# Altium PCB PCB1.pcbdoc (part 2 of 2)
Units mil, origin at the board's own origin, x right, y up, seen from the top; angles counter-clockwise.
Board outline 3937.01 x 2559.06 mil, 2 copper layers (Top Layer, Bottom Layer), stack 62.206 mil thick; 130 components, 96 nets, 456 pads, 345 vias.
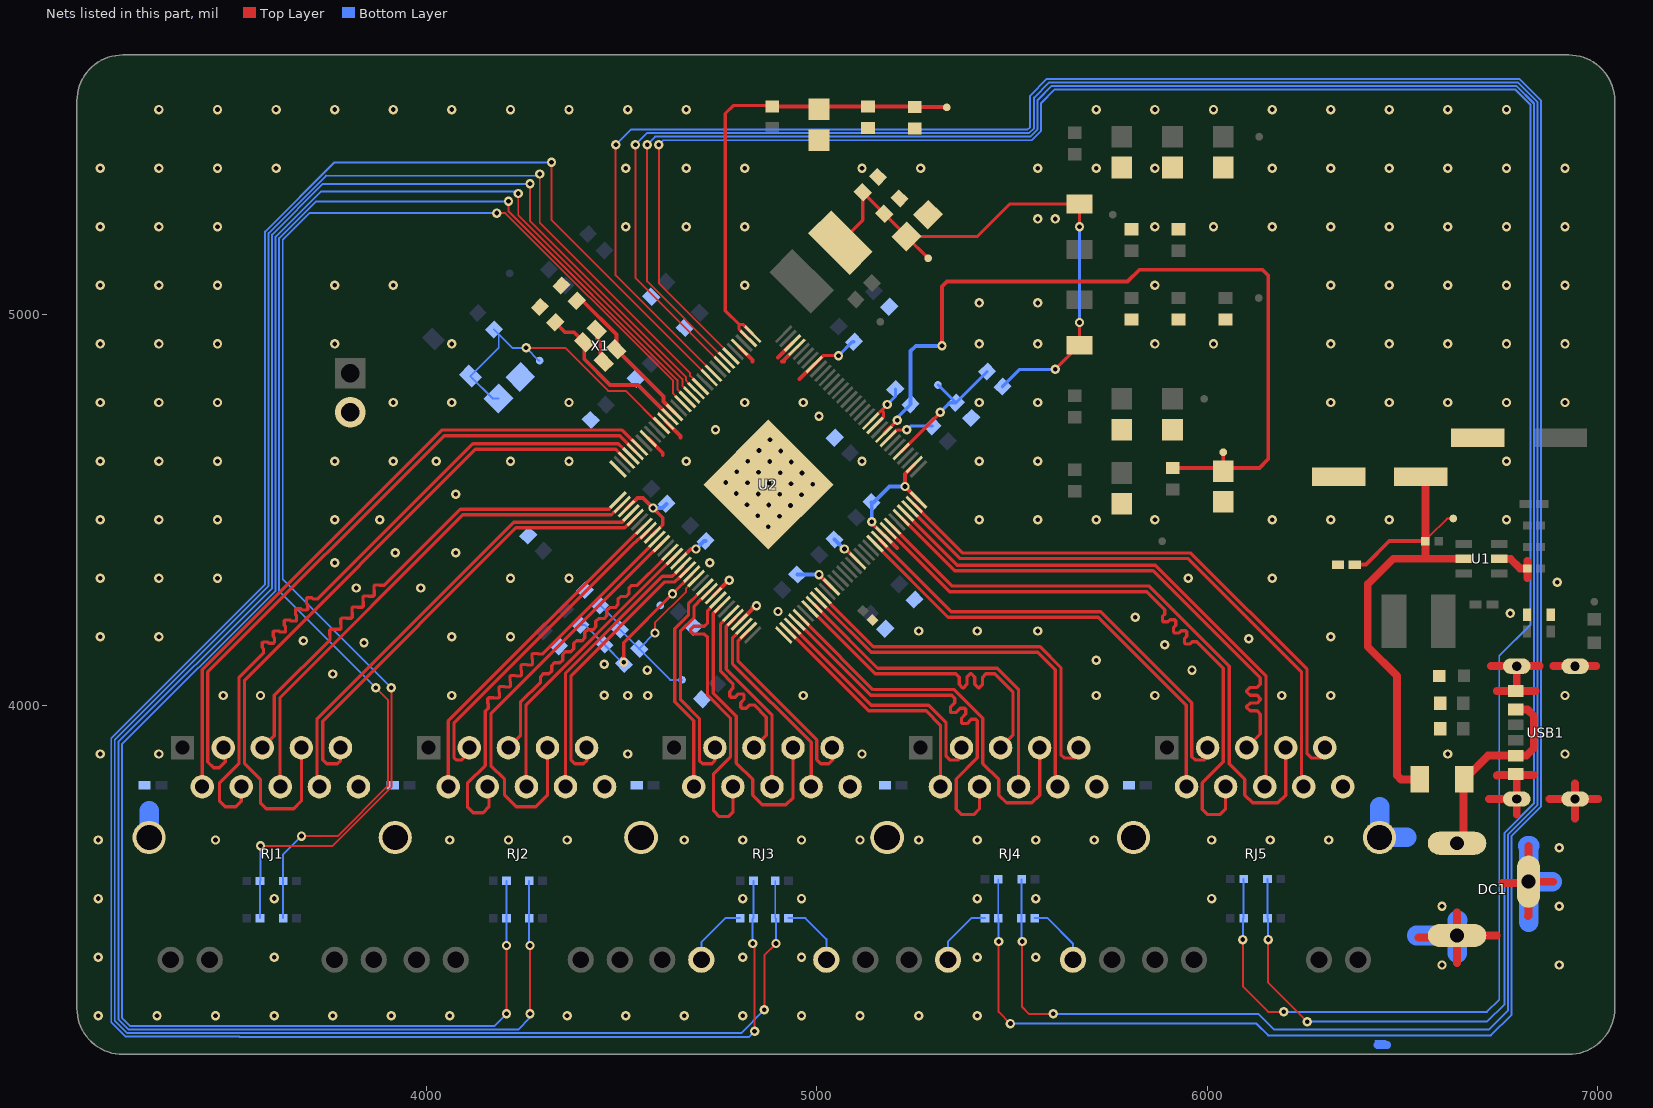
[diagram p2: the nets of this part, all layers, seen from the top]

## Via types
v1: diameter 24, hole 12, Top Layer to Bottom Layer, 190 vias
v2: diameter 24.02, hole 12, Top Layer to Bottom Layer, 155 vias

## Nets (pads, with @x,y where several pads share a name; then routed paths per layer and width w, separated by ;. In a path a pad name is that pad's centre, name@x,y a point inside that pad or via, vN(x,y) a via of type N, cw(c..) or ccw(c..) an arc to the next point about the centre after c; other vN are vias at no path point) (continued)
GND: C2.2 C3.1 C4.1 C6.2 C7.1 C8.1 C9.1 C10.1 C11.1 C12.1 C13.1 C14.1 C15.1 C16.1 C17.1 C18.1 C19.1 C20.1 C21.1 C22.1 C23.1 C24.1 C25.1 C26.1 C27.1 C28.1 C29.1 C30.1 C31.1 C32.1 C33.1 C34.1 C35.1 C36.1 C37.1 C38.1 C39.1 C40.1 C41.1 C42.1 C43.1 C44.1 C45.1 C46.1 C49.1 C50.1 C51.1 C52.1 C53.1 C54.1 C55.1 C56.1 DC1.2 DC1.3 H1.2 L10.1 LED1.1 pad.129 R3.2 R7.1 R9.2 R10.1 R19.2 R20.2 R27.2 R28.2 RJ1.P10 RJ1.SHIELD0 RJ1.SHIELD1 RJ2.P10 RJ2.SHIELD0 RJ2.SHIELD1 RJ3.12 RJ3.13 RJ3.P10 RJ3.SHIELD0 RJ3.SHIELD1 RJ4.12 RJ4.13 RJ4.P10 RJ4.SHIELD0 RJ4.SHIELD1 RJ5.P10 RJ5.SHIELD0 RJ5.SHIELD1 U1.2 U2.1 U2.12 U2.18 U2.24 U2.32 U2.34 U2.40 U2.43 U2.44 U2.57 U2.61 U2.62 U2.68 U2.85 U2.89 U2.96 U2.99 U2.105 U2.111 U2.119 U2.125 USB1.1 USB1.2 USB1.A12 USB1.B12 X1.2 X1.4 | length 4838.1
  Top Layer w8: U2.57@4993.51,4872.06 5016.45,4895 v2(5055.76,4895) ; U2.44@5138.28,4727.3 5165.39,4754.4 5166.36,4754.4 5170.76,4750 5170.76,4737.52 U2.43@5149.41,4716.17 ; 5166.13,4755.37 v2(5180.76,4770) ; U2.40@5182.82,4682.75 5205.07,4705 v2(5230.76,4705)
  Top Layer w10: X1.2@4436.71,4961.05 4436.71,4939.05 4445.76,4930 4445.76,4888 X1.4@4454.81,4878.95 ; U2.99@4513.02,4502.92 4541.13,4531.03 4554.73,4531.03 v2(4580.76,4505) 4605.76,4480 4605.76,4462.03 U2.105@4579.84,4436.11 ; U2.89@4568.7,4682.75 4605.76,4645.69 4605.76,4640 ; U2.85@4613.24,4727.3 4650.76,4689.77 4650.76,4685 ; U2.111@4646.65,4369.29 4677.36,4400 v2(4690.76,4400) ; U2.119@4735.73,4280.21 4770.52,4315 4770.76,4315 v2(4775.76,4320) ; U2.125@4802.55,4213.4 4835.76,4246.61 v2@4835.76,4250 ; U2.68@4802.55,4916.6 4835.76,4883.39 4835.76,4880 ; 4900.76,4890 4905.76,4895 4905.76,4895.66 U2.62@4937.84,4927.74 ; 4910.76,4880 4915.76,4880 4915.76,4883.39 U2.61@4948.97,4916.6 ; 4955.76,4835 4992.82,4872.06 U2.57@4993.51,4872.06 ; v2(5005.76,4334.49) 5006.05,4334.49 U2.12@5038.05,4302.48 ; v2(5070.76,4400) 5073.36,4397.4 5076.76,4397.4 U2.18@5104.87,4369.29 ; v2(5140.76,4470) 5145.76,4465 5145.76,4462.03 U2.24@5171.68,4436.11 5205.76,4402.03 ; U2.34@5249.63,4615.94 5225.76,4592.06 v2(5225.76,4560) 5260.57,4525.19 U2.32@5260.76,4525.19
  Top Layer w20: 6540.76,3405 6633.74,3405 DC1.2@6639.23,3410.46 ; 6639.22,3340 DC1.2@6639.23,3410.46 ; 6639.22,3470 DC1.2@6639.23,3410.46 ; 6720.76,3759.92 USB1.1@6791.94,3759.92 ; 6725.76,4100.08 USB1.2@6791.94,4100.08 ; 6740.76,3410.48 DC1.2@6639.23,3410.46 ; 6740.76,3820 6742.53,3821.77 USB1.B12@6791.94,3821.77 ; 6740.76,4036.34 USB1.A12@6789.97,4036.34 ; U1.2@6746.81,4375 6775.76,4375 6800.76,4350 R3.2@6818.72,4350 ; 6755.76,3545 6819.01,3545 DC1.3@6822.3,3548.32 ; USB1.B12@6789.97,3823.74 USB1.B12@6791.94,3821.77 ; 6791.94,3720 USB1.1@6791.94,3759.92 ; 6818.72,4325 R3.2@6818.72,4350 ; 6818.72,4370 R3.2@6818.72,4350 ; 6820.76,3460 6822.29,3461.53 DC1.3@6822.3,3548.32 ; 6822.29,3640 DC1.3@6822.3,3548.32 ; 6835.76,3821.77 USB1.B12@6791.94,3821.77 ; 6840.76,4036.34 USB1.A12@6789.97,4036.34 ; 6850.76,4100.08 USB1.2@6791.94,4100.08 ; 6875.76,3759.92 6875.84,3760 ; 6875.84,3759.92 USB1.1@6941.55,3759.92 ; 6885.76,3548.28 DC1.3@6822.3,3548.32 ; 6885.76,4100.08 USB1.2@6941.55,4100.08 6995.68,4100.08 ; 6941.55,3710 USB1.1@6941.55,3759.92 ; 6941.55,3800 USB1.1@6941.55,3759.92 ; 7000.76,3759.92 USB1.1@6941.55,3759.92 ; USB1.A12@6789.97,4036.34 6791.94,4038.31 USB1.2@6791.94,4100.08 ; USB1.1@6791.94,3759.92 USB1.B12@6791.94,3821.77
  Bottom Layer w5: RJ3.12@4704.41,3348.42 4704.41,3393.65 4765.76,3455 R19.2@4803.72,3455 ; R20.2@4927.8,3455 4970.76,3455 5024.41,3401.35 RJ3.13@5024.41,3348.42 ; RJ4.12@5335.76,3348.42 5335.76,3395 5395.76,3455 R27.2@5430.52,3455 ; R28.2@5557.8,3455 5590.76,3455 5655.76,3390 RJ4.13@5655.76,3348.42 ; 6430.76,3140 6455.76,3140
  Bottom Layer w8: v2(5055.76,4895) 5091.27,4930.51 C39.1@5095.25,4930.51 ; v2(5180.76,4770) 5201.27,4790.51 C44.1@5201.27,4809.49 ; v2(5230.76,4705) 5240.25,4714.49 C20.1@5296.27,4714.49
  Bottom Layer w10: v2(4580.76,4505) 4604.73,4505 C22.1@4615.25,4515.51 ; v2(4690.76,4400) 4711.27,4420.51 C23.1@4715.25,4420.51 ; C24.1@4950.25,4334.49 v2(5005.76,4334.49) ; C25.1@5045.25,4424.49 5069.73,4400 v2(5070.76,4400) ; v2(5140.76,4470) 5140.76,4518.98 C33.1@5140.25,4519.49 5145.25,4519.49 5185.76,4560 v2(5225.76,4560)
  Bottom Layer w20: 6435.76,3130 6460.76,3130
  Bottom Layer w50: RJ1.SHIELD1@3290.76,3661.44 3290.76,3730 ; 6440.76,3740 RJ5.SHIELD0@6440.76,3661.44 6510.76,3661.44 ; 6535.76,3410.48 DC1.2@6639.23,3410.46 ; 6639.22,3365 DC1.2@6639.23,3410.46 ; 6640.76,3450 6639.22,3450 DC1.2@6639.23,3410.46 ; 6822.29,3445 DC1.3@6822.3,3548.32 ; 6825.76,3640 6820.76,3640 6822.29,3638.47 DC1.3@6822.3,3548.32 ; 6882.48,3548.28 DC1.3@6822.3,3548.32
  other v1: 3160.76,3205 3310.76,3205 3460.76,3205 3610.76,3205 3760.76,3205 3910.76,3205 4060.76,3205 4360.76,3205 4510.76,3205 4660.76,3205 4810.76,3205 4960.76,3205 5110.76,3205 5260.76,3205 5410.76,3205 6600.76,3335 6900.76,3335 3160.76,3355 3610.76,3355 4810.76,3355 4960.76,3355 5410.76,3355 5560.76,3355 6600.76,3485 6900.76,3485 3160.76,3505 3610.76,3505 4810.76,3505 4960.76,3505 5410.76,3505 5560.76,3505 6010.76,3505 6900.76,3635 3160.76,3655 3460.76,3655 4060.76,3655 4210.76,3655 4360.76,3655 4660.76,3655 4810.76,3655 4960.76,3655 5110.76,3655 5260.76,3655 5410.76,3655 5560.76,3655 5710.76,3655 6010.76,3655 6160.76,3655 6310.76,3655 3165.76,3875 3315.76,3875 4515.76,3875 5115.76,3875 6615.76,3875 6915.76,3875 4065.76,4025 4515.76,4025 4965.76,4025 5715.76,4025 5865.76,4025 6315.76,4025 6915.76,4025 5715.76,4115 5890.76,4155 3165.76,4175 3315.76,4175 4065.76,4175 4215.76,4175 6315.76,4175 3165.76,4325 3315.76,4325 3465.76,4325 4215.76,4325 4365.76,4325 6165.76,4325 3165.76,4475 3315.76,4475 3465.76,4475 3765.76,4475 5415.76,4475 5565.76,4475 5715.76,4475 5865.76,4475 6165.76,4475 6315.76,4475 6465.76,4475 6765.76,4475 3165.76,4625 3315.76,4625 3465.76,4625 3765.76,4625 3915.76,4625 4215.76,4625 4365.76,4625 4665.76,4625 5115.76,4625 5415.76,4625 5565.76,4625 6765.76,4625 3165.76,4775 3315.76,4775 3465.76,4775 3915.76,4775 4065.76,4775 4365.76,4775 4815.76,4775 4965.76,4775 5415.76,4775 5565.76,4775 6315.76,4775 6465.76,4775 6615.76,4775 6765.76,4775 6915.76,4775 3165.76,4925 3315.76,4925 3465.76,4925 3765.76,4925 4065.76,4925 5415.76,4925 5565.76,4925 5865.76,4925 6015.76,4925 6315.76,4925 6465.76,4925 6615.76,4925 6765.76,4925 6915.76,4925 3165.76,5075 3315.76,5075 3465.76,5075 3765.76,5075 3915.76,5075 4815.76,5075 5865.76,5075 6315.76,5075 6465.76,5075 6615.76,5075 6765.76,5075 6915.76,5075 3165.76,5225 3315.76,5225 3465.76,5225 4510.76,5225 4665.76,5225 4815.76,5225 5865.76,5225 6015.76,5225 6165.76,5225 6315.76,5225 6465.76,5225 6615.76,5225 6765.76,5225 6915.76,5225 3165.76,5375 3315.76,5375 3465.76,5375 3615.76,5375 4510.76,5375 4665.76,5375 4815.76,5375 5115.76,5375 5265.76,5375 5565.76,5375 5715.76,5375 5865.76,5375 6165.76,5375 6315.76,5375 6465.76,5375 6615.76,5375 6765.76,5375 6915.76,5375 3315.76,5525 3465.76,5525 3615.76,5525 3765.76,5525 3915.76,5525 4065.76,5525 4215.76,5525 4365.76,5525 4515.76,5525 4665.76,5525 5715.76,5525 5865.76,5525 6015.76,5525 6165.76,5525 6315.76,5525 6465.76,5525 6615.76,5525 6765.76,5525
  other v2: 3480.76,4025 3575.76,4025 4567.08,4025 6190.76,4025 4455.76,4025.68 3760.76,4080 4565.76,4090 5960.76,4090 4455.76,4105 3840.76,4160 3685.76,4165 6105.76,4170 5260.76,4190 5410.76,4190 5565.76,4190 5815.76,4225 6775.76,4235 4900.76,4240 4845.76,4255 3820.76,4300 3985.76,4300 6895.76,4315 5950.76,4325 3765.76,4365 4725.76,4365 3920.76,4390 4075.76,4390 4875.99,4456.79 3880.76,4475 4904.37,4484.08 4848.7,4485.17 4932.75,4511.37 4877.08,4512.46 4821.41,4513.54 4961.12,4538.66 4075.76,4540 4905.46,4539.75 4849.79,4540.83 4794.12,4541.92 4989.5,4565.95 4933.83,4567.04 4878.16,4568.12 4822.5,4569.21 4766.83,4570.3 4962.21,4594.33 4906.54,4595.42 4850.87,4596.5 4795.21,4597.59 4934.92,4622.71 4879.25,4623.79 4025.76,4625 4823.58,4624.88 4907.63,4651.08 4851.96,4652.17 4880.34,4679.46 4740.76,4705 5005.76,4740 5415.76,5030 5565.76,5030 5565.76,5245 5610.76,5245
HV_SWR: C28.2 C29.2 C30.2 L4.2 TP6.1 U2.65 U2.66 | length 1233.9
  Top Layer w8: U2.66@4824.82,4938.88 4800.76,4962.94 4800.76,4975 ; U2.65@4835.95,4950.01 4835.75,4950.01 4810.95,4975 4800.76,4975 ; L4.2@4885.76,5532.95 4883.71,5535 4785.76,5535 4765.76,5515 4765.76,5010 4800.76,4975
  Top Layer w10: L4.2@4885.76,5532.95 C28.2@4998.26,5532.95 ; C28.2@5005.76,5525.45 C28.2@4998.26,5532.95 ; C29.2@5130.71,5532.95 C28.2@4998.26,5532.95 ; C29.2@5130.76,5532.99 5249.53,5532.99 C30.2@5250.76,5531.77 5331.57,5531.77 TP6.1@5332.74,5530.59
NRST: C51.2 D1.2 R13.1 TP15.1 U2.86 | length 811.4
  Top Layer w5: v2(4255.76,4915) 4355.76,4915 4465.76,4805 4510.76,4805 4599.59,4716.17 U2.86@4602.11,4716.17
  Bottom Layer w5: D1.2@4113.09,4842.67 D1.2@4113.43,4842.67 ; R13.1@4173.97,4961.9 4185.76,4950.11 ; C51.2@4185.16,4785.03 4171.07,4785.03 D1.2@4113.43,4842.67 ; TP15.1@4290.4,4882.36 4288.4,4882.36 v2(4255.76,4915) 4220.87,4915 4185.76,4950.11 ; D1.2@4113.43,4842.67 4185.76,4915 4185.76,4950.11
P0_LED0: R15.1 R21.1 U2.81 | length 3374.7
  Top Layer w5: v2(3575.76,3640) 3760.76,3640 3910.76,3790 v2(3910.76,4045) ; v2(4180.76,5260) 4203.03,5260 4632.18,4830.85 4632.18,4797.45 U2.81@4657.79,4771.84
  Bottom Layer w5: R21.1@3574.6,3455 R15.1@3574.6,3550 3575.76,3551.16 v2(3575.76,3640) ; v2(3910.76,4045) 3632.76,4323 3632.76,5192 3700.76,5260 v2(4180.76,5260)
P0_LED1: R16.1 R22.2 U2.80 | length 3348.8
  Top Layer w5: v2(3680.76,3665) 3773.03,3665 3901.76,3793.73 3901.76,4014 v2(3870.76,4045) ; v2(4210.76,5290) 4210.76,5265 4643.31,4832.45 4643.31,4808.58 U2.80@4668.92,4782.97
  Bottom Layer w5: R22.2@3633.72,3455 R16.1@3633.72,3550 3633.72,3617.96 v2(3680.76,3665) ; v2(3870.76,4045) 3623.76,4292 3623.76,5195.73 3718.03,5290 v2(4210.76,5290) v2@4215.76,5290
  other v2: 4210.76,5290
P0MDIA_N: RJ1.P3 U2.92 | length 1689.1
  Top Layer w8.4: RJ1.P3@3479.42,3891.34 RJ1.P3@3480.56,3891.34 3485.76,3886.14 3485.76,3855.38 3470.38,3840 3455.76,3840 3441.06,3854.7 3441.06,4085.3 4045.76,4690 4495.6,4690 4515.99,4669.61 4515.99,4668.66 U2.92@4535.29,4649.35
P0MDIA_P: RJ1.P2 U2.91 | length 1691.9
  Top Layer w8.4: RJ1.P2@3426.66,3791.34 3426.66,4091.26 4039.79,4704.4 4501.56,4704.4 4526.17,4679.8 4527.12,4679.8 U2.91@4546.43,4660.49
P0MDIB_N: RJ1.P7 U2.94 | length 1821.2
  Top Layer w8.4: RJ1.P7@3680.56,3891.34 3680.56,3754.8 3660.76,3735 3590.76,3735 3575.76,3750 3575.76,3810 3535.16,3850.6 3535.16,4064.4 4125.76,4655 4485.31,4655 4493.71,4646.6 4493.71,4646.39 U2.94@4513.02,4627.08
P0MDIB_P: RJ1.P4 U2.93 | length 1817.1
  Top Layer w8.4: RJ1.P4@3526.66,3791.34 3526.66,3753.75 3512.91,3740 3485.76,3740 3470.76,3755 3470.76,3800.23 3520.76,3850.23 3520.76,4070.36 3583.34,4132.94 3583.34,4144.82 3580.4,4147.76 3580.4,4159.64 3582.66,4161.9 3594.54,4161.9 3597.48,4158.97 3609.36,4158.97 3611.62,4161.23 3611.62,4173.11 3608.68,4176.05 3608.68,4187.93 3610.95,4190.19 3622.83,4190.19 3625.77,4187.25 3637.64,4187.25 3639.91,4189.51 3639.91,4201.39 3636.97,4204.33 3636.97,4216.21 3639.23,4218.47 3651.11,4218.47 3654.05,4215.53 3665.93,4215.53 3668.19,4217.8 3668.19,4229.68 3665.25,4232.61 3665.25,4244.49 3667.52,4246.76 3679.4,4246.76 3682.33,4243.82 3694.21,4243.82 3696.48,4246.08 3696.48,4257.96 3693.54,4260.9 3693.54,4272.78 3695.8,4275.04 3707.68,4275.04 3710.62,4272.1 3722.5,4272.1 4119.79,4669.4 4492.02,4669.4 4503.89,4657.52 4504.85,4657.52 U2.93@4524.16,4638.21
P0MDIC_N: RJ1.P6 U2.98 | length 1309.6
  Top Layer w8.4: RJ1.P6@3626.66,3791.34 3625.76,3792.24 3625.76,4019.64 4093.69,4487.56 4474.44,4487.56 4481.63,4494.75 4482.58,4494.75 U2.98@4501.88,4514.06
P0MDIC_P: RJ1.P5 U2.97 | length 1312.3
  Top Layer w8.4: RJ1.P5@3580.56,3891.34 3611.36,3922.14 3611.36,4025.6 3753.93,4168.17 3753.93,4180.05 3753.31,4180.67 3753.31,4192.55 3755.57,4194.81 3767.45,4194.81 3768.07,4194.19 3779.95,4194.19 3782.21,4196.45 3782.21,4208.33 3781.59,4208.95 3781.59,4220.83 3783.86,4223.1 3795.73,4223.1 3796.36,4222.48 3808.23,4222.48 3810.5,4224.74 3810.5,4236.62 3809.88,4237.24 3809.88,4249.12 3812.14,4251.38 3824.02,4251.38 3824.64,4250.76 3836.52,4250.76 3838.78,4253.02 3838.78,4264.9 3838.16,4265.52 3838.16,4277.4 3840.42,4279.66 3852.3,4279.66 3852.92,4279.04 3864.8,4279.04 3867.07,4281.31 3867.07,4293.19 3866.45,4293.81 3866.45,4305.69 3868.71,4307.95 3880.59,4307.95 3881.21,4307.33 3893.09,4307.33 4087.72,4501.96 4468.48,4501.96 4471.45,4504.93 4471.45,4505.88 U2.97@4490.75,4525.19
P0MDID_N: RJ1.P9 U2.101 | length 1201.3
  Top Layer w8.4: RJ1.P9@3780.56,3891.34 3780.76,3891.14 3780.76,3858.4 3772.36,3850 3745.76,3850 3735.16,3860.6 3735.16,3959.4 4229.91,4454.15 4507.84,4454.15 4515.03,4461.34 4515.99,4461.34 U2.101@4535.29,4480.65
P0MDID_P: RJ1.P8 U2.100 | length 1198.5
  Top Layer w8.4: RJ1.P8@3726.66,3791.34 3720.76,3797.24 3720.76,3965.36 4223.95,4468.55 4501.88,4468.55 4504.85,4471.52 4504.85,4472.48 U2.100@4524.16,4491.79
P1_LED0: R17.1 R23.1 U2.79 | length 4882.9
  Top Layer w5: v2@4205.76,3208.17 v2(4205.76,3210) v2(4205.76,3385) ; v2(4235.76,5310) 4235.76,5255 4655.76,4835 4655.76,4818.4 U2.79@4680.05,4794.11
  Bottom Layer w5: R17.1@4205.52,3550.52 R23.1@4205.52,3455 4205.52,3385.24 v2(4205.76,3385) ; v2(4205.76,3210) 4174.25,3178.49 3242.27,3178.49 3220.76,3200 3220.76,3899.66 3614.76,4293.66 3614.76,5199.46 3730.3,5315 4230.76,5315 v2(4235.76,5310)
P1_LED1: R18.1 R24.2 U2.78 | length 5020.8
  Top Layer w5: v2(4265.76,3210) v2(4265.76,3385) ; v2(4265.76,5335) 4265.76,5240 4665.58,4840.18 4665.58,4830.85 U2.78@4691.19,4805.25
  Bottom Layer w5: R18.1@4263.72,3550.52 R24.2@4263.72,3455 4263.72,3387.04 v2(4265.76,3385) ; v2(4265.76,3210) 4265.76,3200 4235.25,3169.49 3238.54,3169.49 3211.76,3196.27 3211.76,3906 3605.76,4300 3605.76,5205 3735.76,5335 v2(4265.76,5335)
P1MDIA_N: RJ2.P3 U2.104 | length 877.9
  Top Layer w8.4: RJ2.P3@4110.56,3891.34 4110.56,3879.46 4091.1,3860 4077.14,3860 4071.06,3866.08 4071.06,3953.78 4529.17,4411.9 U2.104@4568.7,4447.25 U2.104@4549.39,4427.94
P1MDIA_P: RJ2.P2 U2.103 | length 875.9
  Top Layer w8.4: RJ2.P2@4056.66,3791.34 4056.66,3959.75 4555.29,4458.38 U2.103@4557.56,4458.38
P1MDIB_N: RJ2.P7 U2.107 | length 1095.7
  Top Layer w8.4: RJ2.P7@4310.56,3891.34 4310.56,3769.8 4280.76,3740 4230.76,3740 4200.76,3770 4200.76,3810 4165.76,3845 4165.76,3978.44 4581.85,4394.53 4582.8,4394.53 U2.107@4602.11,4413.83
P1MDIB_P: RJ2.P4 U2.106 | length 1093.2
  Top Layer w8.4: RJ2.P4@4156.66,3791.34 4160.76,3787.24 4160.76,3740 4145.76,3725 4120.76,3725 4105.76,3740 4105.76,3800 4151.36,3845.6 4151.36,3984.4 4159.2,3992.25 4159.2,4004.12 4157.98,4005.34 4157.98,4017.22 4160.24,4019.49 4172.12,4019.49 4173.34,4018.27 4185.22,4018.27 4187.48,4020.53 4187.48,4032.41 4186.27,4033.63 4186.27,4045.51 4188.53,4047.77 4200.41,4047.77 4201.63,4046.55 4213.51,4046.55 4215.77,4048.81 4215.77,4060.69 4214.55,4061.91 4214.55,4073.79 4216.81,4076.05 4228.69,4076.05 4229.91,4074.84 4241.79,4074.84 4244.05,4077.1 4244.05,4088.98 4242.83,4090.2 4242.83,4102.08 4245.1,4104.34 4256.98,4104.34 4258.2,4103.12 4270.07,4103.12 4272.34,4105.38 4272.34,4117.26 4271.12,4118.48 4271.12,4130.36 4273.38,4132.62 4285.26,4132.62 4286.48,4131.4 4298.36,4131.4 4571.66,4404.71 4571.66,4405.66 U2.106@4590.97,4424.97
P1MDIC_N: RJ2.P6 U2.110 | length 747.3
  Top Layer w8.4: RJ2.P6@4256.66,3791.34 4255.76,3792.24 4255.76,4001.63 4615.25,4361.12 4616.2,4361.12 U2.110@4635.51,4380.43
P1MDIC_P: RJ2.P5 U2.109 | length 746.2
  Top Layer w8.4: RJ2.P5@4210.56,3891.34 4241.36,3922.14 4241.36,4007.6 4292.95,4059.18 4292.95,4073.33 4300.02,4080.4 4314.16,4080.4 4321.23,4087.47 4321.23,4101.61 4328.3,4108.68 4342.44,4108.68 4349.52,4115.75 4349.52,4129.89 4356.59,4136.97 4370.73,4136.97 4377.8,4144.04 4377.8,4158.18 4384.87,4165.25 4399.01,4165.25 4406.08,4172.32 4406.08,4186.46 4413.15,4193.53 4427.3,4193.53 4434.37,4200.61 4434.37,4214.75 4441.44,4221.82 4455.58,4221.82 4462.65,4228.89 4462.65,4243.03 4469.72,4250.1 4483.87,4250.1 4490.94,4257.17 4490.94,4271.32 4498.01,4278.39 4512.15,4278.39 4519.22,4285.46 4519.22,4299.6 4526.29,4306.67 4540.43,4306.67 4605.07,4371.31 4605.07,4372.26 U2.109@4624.38,4391.57
P1MDID_N: RJ2.P9 U2.113 | length 706.6
  Top Layer w8.4: RJ2.P9@4410.56,3891.34 4410.76,3891.14 4410.76,3858.4 4402.36,3850 4380.76,3850 4371.06,3859.7 4371.06,4075.9 4610.76,4315.6 4636.54,4315.6 4648.66,4327.72 4649.61,4327.72 U2.113@4668.92,4347.03
P1MDID_P: RJ2.P8 U2.112 | length 706.7
  Top Layer w8.4: RJ2.P8@4356.66,3791.34 4356.66,4081.86 4604.79,4330 4630.58,4330 4638.48,4337.9 4638.48,4338.85 U2.112@4657.79,4358.16
P2_LED0: R19.1 R25.1 U2.75 | length 5768.9
  Top Layer w5: v2(4320.76,5390) 4320.76,5242.48 U2.75@4724.59,4838.65 ; v2(4835.76,3390) 4840.76,3385 v2(4840.76,3165)
  Bottom Layer w5: v2(4320.76,5390) 3765.3,5390 3587.76,5212.46 3587.76,4309.73 3193.76,3915.73 3193.76,3188.82 3231.08,3151.49 3521.54,3151.49 3522.03,3151 4826.76,3151 v2(4840.76,3165) ; v2(4835.76,3390) 4835.76,3452.96 R19.1@4837.8,3455 R25.1@4837.8,3550.52
P2_LED1: R20.1 R26.2 U2.77 | length 5695
  Top Layer w5: v2(4290.76,5360) 4290.76,5235 4675.76,4850 4675.76,4842.95 U2.77@4702.33,4816.38 ; v2(4865.76,3220) 4865.76,3360 v2(4895.76,3390)
  Bottom Layer w5: v2(4290.76,5360) 4286.27,5355.51 3761,5355.51 3743.94,5355.91 3596.76,5208.73 3596.76,4306 3202.76,3912 3202.76,3192.54 3234.81,3160.49 4806.25,3160.49 v2(4865.76,3220) ; R26.2@4893.72,3550.52 R20.1@4893.72,3455 4895.76,3452.96 v2(4895.76,3390)
P2MDIA_N: RJ3.P3 U2.118 | length 563.6
  Top Layer w8.4: U2.118@4724.59,4291.35 4705.29,4272.04 4704.34,4272.04 4685.76,4253.46 4685.76,4224.64 4650.94,4189.82 4650.94,4014.82 4699.71,3966.05 4699.71,3858.4 4708.11,3850 4730.81,3850 4739.21,3858.4 RJ3.P3@4739.21,3891.34
P2MDIA_P: RJ3.P2 U2.117 | length 563.2
  Top Layer w8.4: RJ3.P2@4685.31,3791.34 4685.31,3960.08 4636.54,4008.85 4636.54,4195.78 4671.36,4230.6 4671.36,4259.43 4694.16,4282.22 4694.16,4283.17 U2.117@4713.46,4302.48
P2MDIB_N: RJ3.P7 U2.121 | length 789.3
  Top Layer w8.4: U2.121@4758,4257.94 4738.7,4238.63 4737.74,4238.63 4734.77,4235.66 4734.77,4030.99 4793.81,3971.95 4793.81,3851.95 4835.76,3810 4835.76,3770 4860.76,3745 4920.76,3745 4939.21,3763.45 RJ3.P7@4939.21,3891.34
P2MDIB_P: RJ3.P4 U2.120 | length 786.1
  Top Layer w8.4: U2.120@4746.87,4269.08 4727.56,4249.77 4727.56,4248.81 4720.37,4241.63 4720.37,4210.52 4711.97,4202.12 4685.06,4202.12 4676.66,4193.72 4676.66,4190.52 4685.06,4182.12 4711.97,4182.12 4720.37,4173.72 4720.37,4025.02 4779.41,3965.98 4779.41,3868.65 4735.76,3825 4735.76,3729.48 4750.24,3715 4773.97,3715 4785.31,3726.34 RJ3.P4@4785.31,3791.34
P2MDIC_N: RJ3.P6 U2.124 | length 491.9
  Top Layer w8.4: U2.124@4791.41,4224.54 4772.1,4205.23 4771.15,4205.23 4768.18,4202.26 4768.18,4092.58 4885.31,3975.45 RJ3.P6@4885.31,3791.34
P2MDIC_P: RJ3.P5 U2.123 | length 492.5
  Top Layer w8.4: U2.123@4780.27,4235.67 4760.96,4216.36 4760.96,4215.41 4753.78,4208.22 4753.78,4086.62 4785.41,4054.99 4785.41,4043.11 4776.98,4034.68 4776.98,4022.8 4779.24,4020.54 4791.12,4020.54 4799.55,4028.97 4811.43,4028.97 4813.69,4026.7 4813.69,4014.83 4805.26,4006.4 4805.26,3994.52 4807.53,3992.26 4819.41,3992.26 4827.83,4000.68 4839.71,4000.68 4870.91,3969.48 4870.91,3923.04 RJ3.P5@4839.21,3891.34
P2MDID_N: RJ3.P9 U2.127 | length 503.8
  Top Layer w8.4: U2.127@4824.82,4191.12 4798.55,4164.86 4798.55,4112.57 4999.98,3911.15 4999.98,3860.78 5010.76,3850 5030.76,3850 5040.76,3860 RJ3.P9@5040.76,3889.79
P2MDID_P: RJ3.P8 U2.126 | length 506.7
  Top Layer w8.4: U2.126@4813.68,4202.26 4794.37,4182.95 4794.37,4182 4784.15,4171.78 4784.15,4106.61 4985.58,3905.18 4985.58,3791.6 RJ3.P8@4985.31,3791.34
P3_LED0: R27.1 R31.1 U2.74 | length 7268.6
  Top Layer w5: v2(4485.76,5435) 4485.25,5434.49 4485.25,5100.51 4735.73,4850.03 U2.74@4735.73,4849.79 ; v2(5465.76,3395) 5465.76,3215 v2(5495.76,3185)
  Bottom Layer w5: v2(4485.76,5435) 4524.27,5473.51 5539.27,5473.51 5546.08,5480.32 5546.08,5560.32 5589.26,5603.5 6797.26,5603.5 6797.64,5603.12 6798.78,5603.5 6854.26,5548.02 6854.26,3741.18 6778.76,3665.68 6778.76,3208 6725.76,3155 6155.76,3155 6125.76,3185 v2(5495.76,3185) ; R31.1@5464.6,3554.51 R27.1@5464.6,3455 5465.76,3453.84 v2(5465.76,3395)
P3_LED1: R28.1 R32.2 U2.72 | length 7070.2
  Top Layer w5: v2(4535.76,5435) 4535.76,5094.31 U2.72@4758,4872.06 ; v2(5525.76,3395) 5525.76,3227.42 5543.18,3210 v2(5605.76,3210)
  Bottom Layer w5: v2(4535.76,5435) 4565.27,5464.51 5542.99,5464.51 5556.26,5477.77 5556.26,5555.5 5595.26,5594.5 6795.05,5594.5 6845.26,5544.29 6845.26,3744.9 6769.76,3669.4 6769.76,3219 6720.25,3169.49 6171.27,3169.49 6130.76,3210 v2(5605.76,3210) ; R32.2@5524.42,3554.51 5524.42,3455.7 R28.1@5523.72,3455 5523.72,3397.04 v2(5525.76,3395)
P3MDIA_N: RJ4.P3 U2.3 | length 651.5
  Top Layer w8.4: U2.3@4937.84,4202.26 4957.14,4182.95 4957.14,4182 5139.14,4000 5286.12,4000 5331.06,3955.06 5331.06,3869.7 5340.76,3860 5362.16,3860 5370.56,3868.4 RJ4.P3@5370.56,3891.34
P3MDIA_P: RJ4.P2 U2.2 | length 648
  Top Layer w8.4: U2.2@4926.7,4191.12 4946.01,4171.82 4946.96,4171.82 5133.18,3985.6 5280.16,3985.6 5316.66,3949.1 RJ4.P2@5316.66,3791.34
P3MDIB_N: RJ4.P7 U2.5 | length 1028.7
  Top Layer w8.4: U2.5@4960.11,4224.54 4979.42,4205.23 4979.42,4204.27 5143.69,4040 5351.72,4040 5425.16,3966.56 5425.16,3850.6 5465.76,3810 5465.76,3770 5485.76,3750 5550.76,3750 5570.56,3769.8 RJ4.P7@5570.56,3891.34
P3MDIB_P: RJ4.P4 U2.4 | length 1033.4
  Top Layer w8.4: U2.4@4948.97,4213.4 4968.28,4194.09 4969.24,4194.09 5137.73,4025.6 5345.76,4025.6 5353.16,4018.2 5353.16,4006.32 5342.24,3995.4 5342.24,3983.52 5344.5,3981.26 5356.38,3981.26 5367.3,3992.18 5379.18,3992.18 5381.44,3989.91 5381.44,3978.04 5370.52,3967.11 5370.52,3955.24 5372.79,3952.97 5384.67,3952.97 5395.59,3963.89 5407.47,3963.89 5410.76,3960.6 5410.76,3865 5356.86,3811.1 5356.86,3733.9 5370.76,3720 5401.98,3720 5416.66,3734.68 RJ4.P4@5416.66,3791.34
P3MDIC_N: RJ4.P6 U2.8 | length 862.7
  Top Layer w8.4: U2.8@4993.51,4257.94 5012.82,4238.63 5012.82,4237.68 5155.5,4095 5461.72,4095 5516.66,4040.06 RJ4.P6@5516.66,3791.34
P3MDIC_P: RJ4.P5 U2.7 | length 866.9
  Top Layer w8.4: U2.7@4982.38,4246.8 5001.69,4227.49 5002.64,4227.49 5149.53,4080.6 5356.15,4080.6 5364.55,4072.2 5364.55,4053.4 5372.95,4045 5376.15,4045 5384.55,4053.4 5384.55,4072.2 5392.95,4080.6 5396.15,4080.6 5404.55,4072.2 5404.55,4053.4 5412.95,4045 5416.15,4045 5424.55,4053.4 5424.55,4072.2 5432.95,4080.6 5455.76,4080.6 5502.26,4034.1 5502.26,3923.04 RJ4.P5@5470.56,3891.34
P3MDID_N: RJ4.P9 U2.10 | length 979.7
  Top Layer w8.4: U2.10@5015.79,4280.21 5035.1,4260.9 5035.1,4259.95 5145.05,4150 5571.72,4150 5625.16,4096.56 5625.16,3873.4 5633.56,3865 5662.36,3865 5670.76,3873.4 5670.76,3891.14 RJ4.P9@5670.56,3891.34
P3MDID_P: RJ4.P8 U2.9 | length 981.7
  Top Layer w8.4: U2.9@5004.65,4269.08 5023.96,4249.77 5024.91,4249.77 5139.08,4135.6 5565.76,4135.6 5610.76,4090.6 5610.76,3797.24 RJ4.P8@5616.66,3791.34
P4_LED0: R29.1 R33.1 U2.70 | length 6261.3
  Top Layer w5: v2(4595.76,5435) 4595.76,5080 4780.27,4895.49 U2.70@4780.27,4894.33 ; v2(6090.76,3400) 6090.76,3280 6155.76,3215 v2(6195.76,3215)
  Bottom Layer w5: v2(4595.76,5435) 4607.27,5446.51 5550.45,5446.51 5574.26,5470.32 5574.26,5541.83 5608.92,5576.5 6787.59,5576.5 6827.26,5536.83 6827.26,4206.5 6747.26,4126.5 6747.26,3246.5 6715.76,3215 v2(6195.76,3215) ; v2(6090.76,3400) 6090.76,3452.96 R33.1@6092.8,3455 R29.1@6092.8,3555
P4_LED1: R30.1 R34.2 U2.71 | length 6294.4
  Top Layer w5: v2(4565.76,5435) 4565.76,5085 U2.71@4764.46,4886.3 ; v2(6155.76,3400) 6155.76,3290 v2(6255.76,3190)
  Bottom Layer w5: v2(4565.76,5435) 4586.27,5455.51 5546.72,5455.51 5565.26,5474.04 5565.26,5549.5 5601.26,5585.5 6791.32,5585.5 6836.26,5540.56 6836.26,3748.63 6760.76,3673.13 6760.76,3235 6715.76,3190 v2(6255.76,3190) ; R30.1@6153.72,3555 R34.2@6153.72,3455 6155.76,3452.96 v2(6155.76,3400)
P4MDIA_N: RJ5.P3 U2.23 | length 1181.7
  Top Layer w8.4: U2.23@5160.55,4424.97 5179.85,4403.38 5343.84,4239.4 5726.72,4239.4 5960.16,4005.96 5960.16,3868.4 5968.56,3860 5992.16,3860 6000.56,3868.4 RJ5.P3@6000.56,3891.34
P4MDIA_P: RJ5.P2 U2.22 | length 1178.1
  Top Layer w8.4: U2.22@5149.41,4413.83 5149.41,4411.57 5335.98,4225 5720.76,4225 5945.76,4000 5945.76,3792.24 RJ5.P2@5946.66,3791.34
P4MDIB_N: RJ5.P7 U2.26 | length 1600.4
  Top Layer w8.4: U2.26@5193.96,4458.38 5213.27,4439.07 5213.27,4438.12 5346.39,4305 5851.12,4305 6055.76,4100.36 6055.76,3850 6095.76,3810 6095.76,3770 6115.76,3750 6180.76,3750 6200.56,3769.8 RJ5.P7@6200.56,3891.34
P4MDIB_P: RJ5.P4 U2.25 | length 1605
  Top Layer w8.4: U2.25@5182.82,4447.25 5202.13,4427.94 5203.08,4427.94 5340.42,4290.6 5845.16,4290.6 5890.72,4245.04 5890.72,4233.16 5885.1,4227.54 5885.1,4215.66 5887.36,4213.4 5899.24,4213.4 5904.86,4219.02 5916.74,4219.02 5919,4216.76 5919,4204.88 5913.38,4199.26 5913.38,4187.38 5915.65,4185.11 5927.53,4185.11 5933.15,4190.73 5945.03,4190.73 5947.29,4188.47 5947.29,4176.59 5941.67,4170.97 5941.67,4159.09 5943.93,4156.83 5955.81,4156.83 5961.43,4162.45 5973.31,4162.45 6040.76,4095 6040.76,3855 5986.86,3801.1 5986.86,3733.9 6000.76,3720 6032.03,3720 6046.66,3734.63 RJ5.P4@6046.66,3791.34
P4MDIC_N: RJ5.P6 U2.29 | length 1381.3
  Top Layer w8.4: U2.29@5227.36,4491.79 5246.67,4472.48 5246.67,4471.52 5359.48,4358.72 5867.04,4358.72 6149.98,4075.78 6149.98,3794.65 RJ5.P6@6146.66,3791.34
P4MDIC_P: RJ5.P5 U2.28 | length 1381.8
  Top Layer w8.4: U2.28@5216.22,4480.65 5235.53,4461.34 5236.49,4461.34 5353.51,4344.32 5861.08,4344.32 6135.58,4069.82 6135.58,4053.91 6127.18,4045.51 6109.32,4045.51 6100.92,4037.11 6100.92,4033.91 6109.32,4025.51 6127.18,4025.51 6135.58,4017.11 6135.58,4013.91 6127.18,4005.51 6109.32,4005.51 6100.92,3997.11 6100.92,3993.91 6109.32,3985.51 6127.18,3985.51 6135.58,3977.11 6135.58,3926.35 RJ5.P5@6100.56,3891.34
P4MDID_N: RJ5.P9 U2.31 | length 1468.3
  Top Layer w8.4: U2.31@5249.63,4514.06 5268.94,4494.75 5268.94,4493.8 5372.74,4390 5956.72,4390 6255.16,4091.56 6255.16,3875.6 6265.76,3865 6292.16,3865 6300.56,3873.4 RJ5.P9@6300.56,3891.34
P4MDID_P: RJ5.P8 U2.30 | length 1471.8
  Top Layer w8.4: U2.30@5238.5,4502.92 5257.81,4483.61 5258.76,4483.61 5366.78,4375.6 5950.76,4375.6 6240.76,4085.6 6240.76,3797.24 RJ5.P8@6246.66,3791.34
PLLGND: C47.1 C48.1 L10.2 TP13.1 U2.115 | length 535.8
  Top Layer w5: v2(4585.76,4185) 4585.76,4211 4665.58,4290.82 4665.58,4299.15 U2.115@4691.19,4324.75
  Bottom Layer w5: L10.2@4445.24,4255.52 4495.25,4205.51 C48.1@4495.25,4194.49 C47.1@4545.25,4144.49 ; v2(4585.76,4185) C47.1@4545.25,4144.49 ; TP13.1@4654.94,4065 4624.73,4065 C47.1@4545.25,4144.49
PLLVDDL: C47.2 C48.2 L9.2 TP12.1 U2.114 | length 494.1
  Top Layer w8: v2(4505.76,4110) 4505.76,4160 v2(4630.76,4285) 4680.05,4334.29 U2.114@4680.05,4335.89
  Bottom Layer w5: L9.2@4395.24,4205.52 4406.27,4205.52 C48.2@4456.27,4155.51 C47.2@4506.27,4105.51 ; TP12.1@4599.41,4255.52 4601.27,4255.52 v2(4630.76,4285)
SVDDH: C43.2 C44.2 L7.2 TP10.1 U2.41 | length 2119
  Top Layer w8: U2.41@5171.68,4693.89 5171.68,4695.92 v2(5205.76,4730)
  Top Layer w10: v2(5320.76,4920) 5320.76,5072.48 5333.28,5085 5795.76,5085 5825.76,5115 6140.76,5115 6155.76,5100 6155.76,4630 6133.31,4607.56 C43.2@6048.94,4607.56 ; L7.2@5911.12,4607.56 C43.2@6032.57,4607.56 ; C43.2@6040.76,4599.37 C43.2@6032.57,4607.56 ; TP10.1@6040.76,4647.56 6040.76,4619.37 6050.76,4609.37 C43.2@6048.94,4607.56 ; C43.2@6032.57,4607.56 C43.2@6048.94,4607.56
  Bottom Layer w8: v2(5205.76,4730) 5205.76,4736.02 C44.2@5240.25,4770.51
  Bottom Layer w10: C44.2@5240.25,4770.51 5240.25,4906.73 5253.51,4920 v2(5320.76,4920)
SVDDL: C45.2 L8.2 TP11.1 U2.37 | length 370.7
  Top Layer w8: U2.37@5216.22,4649.35 5315.76,4748.89 v2(5315.76,4750)
  Bottom Layer w8: TP11.1@5310.09,4819.96 5310.8,4819.96 C45.2@5356.27,4774.49 5340.25,4774.49 v2(5315.76,4750) ; C45.2@5356.27,4774.49 L8.2@5436.27,4854.48
V_BUS: DC1.1 F1.1 USB1.A9 USB1.B9 | length 517.6
  Top Layer w20: DC1.1@6639.22,3646.74 6655.76,3663.25 6655.76,3808.11 F1.1@6657.65,3810 6718.64,3870.99 USB1.B9@6789.97,3870.99 6816.75,3870.99 6835.76,3890 6835.76,3972.99 6819.65,3989.09 USB1.A9@6789.97,3989.09
VBUS: C6.1 C7.2 F1.2 R2.1 TP2.1 U1.5 | length 1358.2
  Top Layer w5: 6567.23,4431.47 6613.78,4478.02 TP2.1@6629.49,4478.02
  Top Layer w10: C7.2@6377.22,4360 6405.76,4360 6465.76,4420 R2.1@6558.08,4420
  Top Layer w20: F1.2@6543.87,3810 6495.76,3810 6485.76,3820 6485.76,4075 6410.76,4150 6410.76,4310 6475.76,4375 6557.26,4375 ; C6.1@6546.4,4585 6558.08,4573.32 R2.1@6558.08,4420 6558.08,4375.82 6557.26,4375 ; U1.5@6656.33,4375 6557.26,4375
VDDL: C8.2 C9.2 C10.2 L2.2 L8.1 R5.1 R6.1 TP3.1 | length 1472
  Top Layer w8: L2.2@5060.26,5184.5 5117.74,5241.98 C10.2@5117.74,5313.61 C9.2@5172.74,5258.61 5229.39,5201.96 C8.2@5229.39,5200.26 C8.2@5229.39,5199.94 ; TP3.1@5285.07,5144.26 C8.2@5229.39,5199.94 ; v2(5610.76,4860) R6.1@5672.54,4921.78 ; R6.1@5672.58,4921.78 v2(5672.58,4980) ; v2(5672.58,5225) R5.1@5672.58,5283.22 5493.98,5283.22 5410.7,5199.94 C8.2@5229.39,5199.94
  Bottom Layer w8: L8.1@5475.24,4815.52 5519.73,4860 v2(5610.76,4860) ; v2(5672.58,4980) v2(5672.58,5225)
XTAL_IN: C50.2 U2.84 X1.3 | length 419.6
  Top Layer w10: C50.2@4330.25,4980.51 4355.76,4955 4378.74,4955 X1.3@4404.7,4929.04 4404.7,4886.06 4470.76,4820 4542.81,4820 U2.84@4624.38,4738.43
XTAL_OUT: C49.2 U2.83 X1.1 | length 398.3
  Top Layer w10: C49.2@4385.25,5035.51 4400.08,5035.51 4486.82,4948.77 X1.1@4486.82,4910.96 4607.41,4790.37 4607.41,4777.68 U2.83@4635.51,4749.57
pads on no net: U2.15 U2.16 U2.19 U2.35 U2.36 U2.38 U2.39 U2.45 U2.46 U2.47 U2.48 U2.49 U2.50 U2.51 U2.52 U2.53 U2.54 U2.55 U2.56 U2.87 U2.88

## Polygon pours and split planes (outlines as drawn)
GND on Top Layer (solid, pour order 0): 3015.76,5750 3015.76,3725 7200.76,3725 7200.76,5750
GND on Top Layer (solid, pour order 2): 3010.76,3710 3010.76,3055 6440.76,3055 6440.76,3710
GND on Bottom Layer (solid, pour order 10): 3050.76,5695 3050.76,3725 7090.71,3725 7090.71,5695
GND on Bottom Layer (solid, pour order 12): 3000,3710 3000,3000 6445.76,3000 6445.76,3710
GND on Top Layer (solid, pour order 8): 6450.76,3897.67 6450.76,3035 7090.71,3035 7090.71,3897.67
GND on Bottom Layer (solid, pour order 16): 6450.76,3780 6450.76,3005 7125.76,3005 7125.76,3780

## Keep-outs
Top Layer:
  region: 6475.76,4299.09 6475.76,4131.47 6600.77,4131.47 6600.77,4299.09
  region: 6656.33,4437.4 6656.33,4312.6 6747.34,4312.6 6747.34,4437.4
  region: 5029.21,5035.01 5104.41,5110.21 4985.57,5229.05 4910.37,5153.85
Board Outline Layer:
  region: 3267.18,5546.89 cw(c3204.18,5546.89) 3141.19,5546.89 cw(c3204.18,5546.89)
  circle w0.1: c3204.18,5546.89 r62.99
  region: 3267.18,5546.89 3266.78,5539.84 3265.6,5532.87 3263.64,5526.08 3260.94,5519.56 3257.52,5513.38 3253.43,5507.61 3248.73,5502.35 3243.46,5497.64 3237.7,5493.55 3231.52,5490.14 3224.99,5487.43 3218.2,5485.48 3211.24,5484.29 3204.18,5483.9 3197.13,5484.29 3190.17,5485.48 3183.38,5487.43 3176.85,5490.14 3170.67,5493.55 3164.91,5497.64 3159.64,5502.35 3154.94,5507.61 3150.85,5513.38 3147.43,5519.56 3144.73,5526.08 3142.77,5532.87 3141.59,5539.84 3141.19,5546.89 3141.59,5553.94 3142.77,5560.91 3144.73,5567.69 3147.43,5574.22 3150.85,5580.4 3154.94,5586.16 3159.64,5591.43 3164.91,5596.14 3170.67,5600.23 3176.85,5603.64 3183.38,5606.35 3190.17,5608.3 3197.13,5609.49 3204.18,5609.88 3211.24,5609.49 3218.2,5608.3 3224.99,5606.35 3231.52,5603.64 3237.7,5600.23 3243.46,5596.14 3248.73,5591.43 3253.43,5586.16 3257.52,5580.4 3260.94,5574.22 3263.64,5567.69 3265.6,5560.91 3266.78,5553.94
  region: 7007.33,5546.89 cw(c6944.34,5546.89) 6881.35,5546.89 cw(c6944.34,5546.89)
  circle w0.1: c6944.34,5546.89 r62.99
  region: 7007.33,5546.89 7006.94,5539.84 7005.75,5532.87 7003.8,5526.08 7001.1,5519.56 6997.68,5513.38 6993.59,5507.61 6988.88,5502.35 6983.62,5497.64 6977.86,5493.55 6971.67,5490.14 6965.15,5487.43 6958.36,5485.48 6951.39,5484.29 6944.34,5483.9 6937.29,5484.29 6930.32,5485.48 6923.54,5487.43 6917.01,5490.14 6910.83,5493.55 6905.07,5497.64 6899.8,5502.35 6895.09,5507.61 6891.01,5513.38 6887.59,5519.56 6884.88,5526.08 6882.93,5532.87 6881.75,5539.84 6881.35,5546.89 6881.75,5553.94 6882.93,5560.91 6884.88,5567.69 6887.59,5574.22 6891.01,5580.4 6895.09,5586.16 6899.8,5591.43 6905.07,5596.14 6910.83,5600.23 6917.01,5603.64 6923.54,5606.35 6930.32,5608.3 6937.29,5609.49 6944.34,5609.88 6951.39,5609.49 6958.36,5608.3 6965.15,5606.35 6971.67,5603.64 6977.86,5600.23 6983.62,5596.14 6988.88,5591.43 6993.59,5586.16 6997.68,5580.4 7001.1,5574.22 7003.8,5567.69 7005.75,5560.91 7006.94,5553.94
  region: 7007.33,3224.06 cw(c6944.34,3224.06) 6881.35,3224.06 cw(c6944.34,3224.06)
  circle w0.1: c6944.34,3224.06 r62.99
  region: 7007.33,3224.06 7006.94,3217 7005.75,3210.04 7003.8,3203.25 7001.1,3196.72 6997.68,3190.54 6993.59,3184.78 6988.88,3179.51 6983.62,3174.81 6977.86,3170.72 6971.67,3167.3 6965.15,3164.6 6958.36,3162.64 6951.39,3161.46 6944.34,3161.06 6937.29,3161.46 6930.32,3162.64 6923.54,3164.6 6917.01,3167.3 6910.83,3170.72 6905.07,3174.81 6899.8,3179.51 6895.09,3184.78 6891.01,3190.54 6887.59,3196.72 6884.88,3203.25 6882.93,3210.04 6881.75,3217 6881.35,3224.06 6881.75,3231.11 6882.93,3238.07 6884.88,3244.86 6887.59,3251.39 6891.01,3257.57 6895.09,3263.33 6899.8,3268.6 6905.07,3273.3 6910.83,3277.39 6917.01,3280.81 6923.54,3283.51 6930.32,3285.47 6937.29,3286.65 6944.34,3287.05 6951.39,3286.65 6958.36,3285.47 6965.15,3283.51 6971.67,3280.81 6977.86,3277.39 6983.62,3273.3 6988.88,3268.6 6993.59,3263.33 6997.68,3257.57 7001.1,3251.39 7003.8,3244.86 7005.75,3238.07 7006.94,3231.11
  region: 3267.18,4090.2 cw(c3204.18,4090.2) 3141.19,4090.2 cw(c3204.18,4090.2)
  circle w0.1: c3204.18,4090.2 r62.99
  region: 3267.18,4090.2 3266.78,4083.14 3265.6,4076.18 3263.64,4069.39 3260.94,4062.87 3257.52,4056.68 3253.43,4050.92 3248.73,4045.65 3243.46,4040.95 3237.7,4036.86 3231.52,4033.44 3224.99,4030.74 3218.2,4028.78 3211.24,4027.6 3204.18,4027.2 3197.13,4027.6 3190.17,4028.78 3183.38,4030.74 3176.85,4033.44 3170.67,4036.86 3164.91,4040.95 3159.64,4045.65 3154.94,4050.92 3150.85,4056.68 3147.43,4062.87 3144.73,4069.39 3142.77,4076.18 3141.59,4083.14 3141.19,4090.2 3141.59,4097.25 3142.77,4104.21 3144.73,4111 3147.43,4117.53 3150.85,4123.71 3154.94,4129.47 3159.64,4134.74 3164.91,4139.45 3170.67,4143.53 3176.85,4146.95 3183.38,4149.65 3190.17,4151.61 3197.13,4152.79 3204.18,4153.19 3211.24,4152.79 3218.2,4151.61 3224.99,4149.65 3231.52,4146.95 3237.7,4143.53 3243.46,4139.45 3248.73,4134.74 3253.43,4129.47 3257.52,4123.71 3260.94,4117.53 3263.64,4111 3265.6,4104.21 3266.78,4097.25
  lines w10: 3105.76,3224.06 3105.76,5546.89 cw(c3223.87,5546.89) 3223.87,5665 6924.66,5665 cw(c6924.66,5546.89) 7042.77,5546.89 7042.77,3224.06 cw(c6924.66,3224.06) 6924.66,3105.94 3223.87,3105.94 cw(c3223.87,3224.06) 3105.76,3224.06

## Silkscreen, mask and mechanical layers (free items; w line width, h text height)
Top Silkscreen Layer:
  text "5-Port Gigabit Ethernet Switch" at 3360.76,5255 h80
  text "YT9215S" at 3365.76,5150 h80
  text "JLCJLCJLCJLC" at 4605.76,4515 h80
Mechanical Layer:
  circle w0.1: c3204.18,5546.89 r62.99
  circle w0.1: c6944.34,5546.89 r62.99
  circle w0.1: c6944.34,3224.06 r62.99
  circle w0.1: c3204.18,4090.2 r62.99